# Altium PCB MB1364.PcbDoc (part 3 of 8)
Units mm, origin at the board's own origin, x right, y up, seen from the top; angles counter-clockwise.
Board outline 70 x 133.34 mm, 6 copper layers (Top Layer, Signal Layer 1, Signal Layer 2, Signal Layer 3, Signal Layer 4, Bottom Layer), stack 1.57 mm thick; 320 components, 286 nets, 1370 pads, 2009 vias.
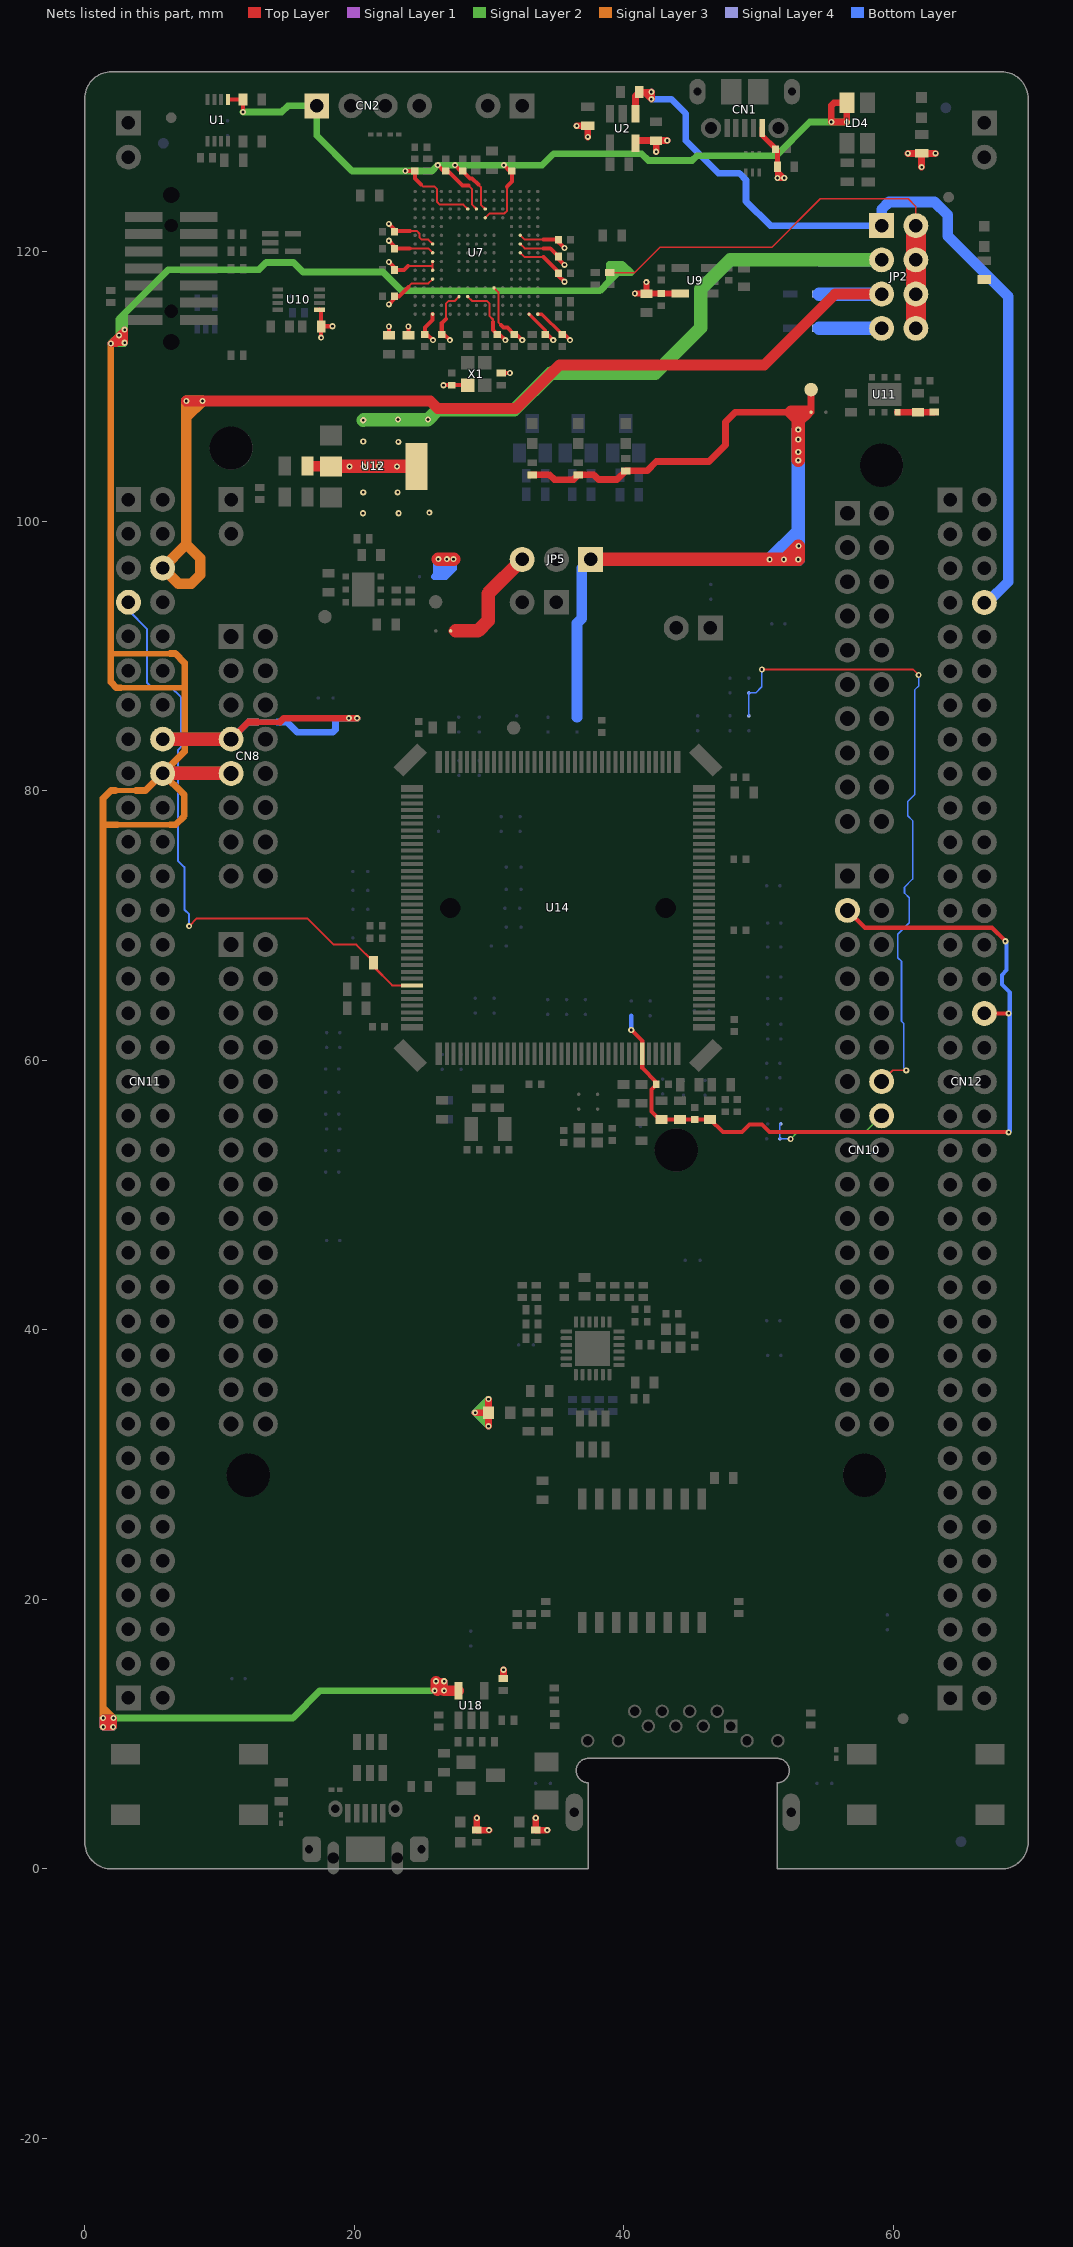
[diagram p6: the nets of this part, all layers, seen from the top]

## Part data (continued)
U18: library part MCD-00083, "Enhanced single channel power switches with active low enable pin", Alternate_Manufacturer="TEXAS INSTRUMENTS", Alternate_Manufacturer_Part_Number=TPS2041C, Manufacturer=STMICROELECTRONICS, BMS_Part_Number=9159003, ComponentLink1Description=Datasheet, ComponentLink1URL=http://tunmcdsvn.tun.st.com/Component_Datasheet_Library/Trunk/IC/STM_PWR-Switch_STMPS2141STR, ECCN_EU=NEC, ECCN_US=EAR99, Internal_Part_Number=MCD-00083, Manufacturer_Part_Number=STMPS2141STR, Part_Type=IC, Provided_By="SUBCO with ST control", Status=Released
U19: library part MCD-00163, "Very low capacitance ESD protection", Manufacturer=STMICROELECTRONICS, BMS_Part_Number=9151075, ComponentLink1Description=Datasheet, ComponentLink1URL=http://tunmcdsvn.tun.st.com/Component_Datasheet_Library/Trunk/Diodes/STM_ESD_USBLC6-2, ECCN_EU=NEC, ECCN_US=EAR99, Internal_Part_Number=MCD-00163, Manufacturer_Part_Number=USBLC6-2SC6, Part_Type=IC, Provided_By="SUBCO with ST control", Status=Released
X1: library part MCD-00597, "Oscillator 25Mhz, +-50ppm, Vcc:3.3V typ, square wave: [0.1Vcc;0.9Vcc], Enable pin, SMD", Alternate_Manufacturer=NDK, Alternate_Manufacturer_Part_Number="NZ2520SB 25MHz END4869B", Manufacturer_Part_Number="NZ2520SH 25MHz END4869C", BMS_Part_Number=9157050, ComponentLink1Description=Datasheet, ComponentLink1URL="http://tunmcdsvn.tun.st.com/Component_Datasheet_Library/Trunk/Crystal_Osc/NDK_NZ2520SH 25MHz END4869C", ECCN_EU=NEC, ECCN_US=EAR99, Internal_Part_Number=MCD-00597, Manufacturer=NDK, Part_Type=Crystal_Osc, Provided_By=SUBCO, Status=Released
X2: library part MCD-00091, "Crystal 32.768kHz, 6pF, +-20ppm, 50Kohms max, SMD", Manufacturer=NDK, Manufacturer_Part_Number="NX3215SA 32.768KHz EXS00A-MU00525", BMS_Part_Number=9157034, ComponentLink1Description=Datasheet, ComponentLink1URL="http://tunmcdsvn.tun.st.com/Component_Datasheet_Library/Trunk/Crystal_Osc/NDK_Crystal-For-ST_NX3215SA 32.768KHz EXS00A-MU00525 (EXS10B-21238)", ECCN_EU=NEC, ECCN_US=EAR99, Internal_Part_Number=MCD-00091, Order_Code_Digikey=644-1386, Part_Type=Crystal_Osc, Provided_By=SUBCO, Status=Released
X3 X4: library part MCD-01364, "Crystal 25MHz, 6pF, +-20ppm, 80ohms max, SMD", Manufacturer=NDK, Manufacturer_Part_Number="NX2016SA 25MHz EXS00A-CS11321", Package=NX2016SA, BMS_Part_Number=9157044, ComponentLink1Description=Datasheet, ComponentLink1URL="http://tunmcdsvn.tun.st.com/Component_Datasheet_Library/Trunk/Crystal_Osc/NDK_NX2016SA 25MHz EXS00A-CS11321 (EXS10B-28187)", ECCN_EU=NEC, ECCN_US=EAR99, Internal_Part_Number=MCD-01364, Order_Code_Digikey=644-1367, Part_Type=Crystal_Osc, Provided_By=SUBCO, Status=Released

## Free pads (board coordinates)
  round 3.2 hole 3.2 unplated: 0(10.866,105.409) 0(12.136,29.209) 0(43.886,53.339) 0(57.856,29.209) 0(59.126,104.139)

## Via types
v1: diameter 0.45, hole 0.2, Top Layer to Bottom Layer, tented both sides, 1933 vias
v2: diameter 0.45, hole 0.2, Top Layer to Bottom Layer, tented top, 67 vias
v3: diameter 0.6, hole 0.3, Top Layer to Bottom Layer, tented both sides, 9 vias

## Nets (pads, with @x,y where several pads share a name; then routed paths per layer and width w, separated by ;. In a path a pad name is that pad's centre, name@x,y a point inside that pad or via, vN(x,y) a via of type N, cw(c..) or ccw(c..) an arc to the next point about the centre after c; other vN are vias at no path point)
1V8: JP5.3 SB80.2 | length 8.5
  Top Layer w0.6: 27.3,91.85 27.525,91.85
  Top Layer w1: 27.525,91.85 29.175,91.85 29.925,92.6 29.925,94.623 JP5.3@32.456,97.154
3V3: CN8.7 CN11.16 JP5.1 L1.2 R26.2 R27.2 R28.2 R56.1 R65.2 R66.2 SB2.2 SB6.1 SB13.1 SB20.1 TP1.1 | length 155.2
  Top Layer w0.4: 12.845,85.089 14.501,85.089
  Top Layer w0.5: CN8.7@10.866,83.819 12.136,85.089 12.845,85.089 ; 14.501,85.089 14.791,85.379 19.166,85.379 v1@20.2,85.379 ; v1(28.966,33.854) L1.2@29.966,33.854 ; v1(29.091,3.779) R65.2@29.091,2.879 v1(29.991,2.879) ; v1(29.966,32.854) L1.2@29.966,33.854 ; v1(29.966,34.854) L1.2@29.966,33.854 ; R56.1@31.066,14.129 v1(31.066,14.779) ; R27.2@33.216,103.429 34.487,103.429 34.841,103.075 36.262,103.075 R28.2@36.616,103.429 37.771,103.429 38.121,103.079 39.491,103.079 R26.2@40.141,103.729 41.711,103.729 42.407,104.425 46.325,104.425 47.55,105.65 47.55,107.35 48.279,108.079 52.425,108.079 ; v1(33.466,3.779) R66.2@33.466,2.879 v1(34.316,2.879) ; 53.55,108.079 SB2.2@53.891,108.079 TP1.1@53.891,109.754
  Top Layer w1: CN11.16@5.786,83.819 CN8.7@10.866,83.819 ; v1(26.241,97.179) v1(26.866,97.179) v1(27.366,97.179) ; JP5.1@37.536,97.154 v1(50.816,97.154) v1(51.866,97.154) v1@51.966,97.154 ; v1(52.941,104.504) v1(52.941,105.129) v1(52.941,106.054) v1(52.941,106.779) 52.941,107.47 ; v1@51.966,97.154 52.941,98.129 v1(52.941,97.154) v1@51.966,97.154 ; 52.941,107.47 52.941,107.563 52.425,108.079 53.55,108.079 52.941,107.47
  Signal Layer 2 w0.5: v1(19.6,85.375) v1(20.2,85.375) ; v1(26.241,97.179) v1(26.866,97.179) v1(27.366,97.179) ; v1(28.966,33.854) 29.676,33.854 ; v1(28.966,33.854) 29.676,33.144 ; v1(28.966,33.854) 29.676,34.564 ; 29.676,33.144 29.676,33.854 ; 29.676,33.144 v1(29.966,32.854) v1(29.966,34.854) 29.676,34.564 ; 29.676,33.854 29.676,34.564
  Signal Layer 2 w0.6: v1(50.816,97.154) v1(51.866,97.154) v1@51.966,97.154 ; v1(52.941,104.504) v1(52.941,105.129) v1(52.941,106.054) v1(52.941,106.779) ; v1@51.966,97.154 v1(52.966,98.154) 52.966,97.179 v1(52.941,97.154) v1@51.966,97.154
  Signal Layer 2 w1: CN11.16@5.786,83.819 CN8.7@10.866,83.819
  Signal Layer 3 w0.5: v1(19.6,85.375) v1(20.2,85.375) ; v1(26.241,97.179) v1(26.866,97.179) v1(27.366,97.179)
  Signal Layer 3 w0.6: v1@50.941,97.154 v1(51.866,97.154) v1@51.966,97.154 ; v1(52.941,104.504) v1(52.941,105.129) v1(52.941,106.054) v1(52.941,106.779) ; v1@51.966,97.154 v1(52.966,98.154) 52.966,97.179 v1(52.941,97.154) v1@51.966,97.154
  Bottom Layer w0.4: 12.845,85.089 14.281,85.089
  Bottom Layer w0.5: CN8.7@10.866,83.819 12.136,85.089 12.845,85.089 ; 14.281,85.089 15.011,85.089 15.775,84.325 18.4,84.325 18.6,84.525 18.6,85.2 SB20.1@18.425,85.375 v1(19.6,85.375) v1(20.2,85.375) ; 26.1,96.379 26.866,97.145 v1(26.866,97.179) ; 26.1,96.379 26.1,97.038 v1(26.241,97.179) v1(26.866,97.179) ; 26.1,96.379 26.1,96.038 SB6.1@25.941,95.879 26.254,95.879 ; 26.254,95.879 26.779,95.879 27.366,96.466 v1@27.366,96.991 ; 26.254,95.879 v1@27.366,96.991 ; v1(26.866,97.179) v1(27.366,97.179) v1@27.366,96.991 ; v1(28.966,33.854) 29.62,33.199 ; v1(28.966,33.854) 29.62,33.854 ; v1(28.966,33.854) 29.62,34.508 ; 29.62,33.199 v1(29.966,32.854) 29.966,33.925 ; 29.62,33.199 29.62,33.854 ; 29.62,33.854 29.895,33.854 29.966,33.925 ; 29.62,33.854 29.62,34.508 ; 29.62,34.508 v1(29.966,34.854) 29.966,33.925
  Bottom Layer w0.8: SB13.1@36.525,85.45 36.525,92.425 36.875,92.775 36.875,96.493 JP5.1@37.536,97.154
  Bottom Layer w1: v1(50.816,97.154) v1@50.841,97.154 ; v1(52.941,106.779) v1(52.941,106.054) v1(52.941,105.129) v1(52.941,104.504) 52.941,99.254 ; v1@50.841,97.154 52.941,99.254 ; v1@50.841,97.154 v1(51.866,97.154) ; v1(51.866,97.154) v1@52.941,98.229 ; v1(51.866,97.154) v1(52.941,97.154) v1@52.941,98.229 ; v1@52.941,98.229 52.941,99.254
3V3_STLK: C2.2 C8.2 C9.2 C10.2 C11.2 C14.2 C15.2 C16.2 C17.2 C21.2 C22.2 C23.2 C24.2 C25.2 C27.2 C29.2 C30.2 C31.2 C32.2 C33.2 C34.2 C35.2 C36.2 C37.2 CN2.1 LD4.4 R24.1 U1.1 U7.C1 U7.C5 U7.C6 U7.C7 U7.C8 U7.C9 U7.F3 U7.G3 U7.G13 U7.H13 U7.J12 U7.J13 U7.K4 U7.N8 U7.N9 U7.N10 U7.P1 U7.R1 U9.5 U10.1 X1.4 | length 141.5
  Top Layer w0.15: 23.996,118.924 25.224,118.924 ; 24.016,117.379 24.271,117.634 25.496,117.634 U7.C5@25.816,117.954 ; 24.116,120.229 25.491,120.229 U7.C8@25.816,119.904 ; 24.141,121.529 24.644,121.529 24.836,121.336 24.836,121.059 25.016,120.879 25.491,120.879 U7.C9@25.816,120.554 ; 24.966,124.954 25.091,124.829 25.941,124.829 26.146,124.624 26.146,123.671 26.339,123.479 28.091,123.479 U7.G13@28.416,123.154 ; 25.225,118.925 25.224,118.924 ; 25.8,118.95 25.774,118.924 25.224,118.924 ; U7.C6@25.816,118.604 U7.C7@25.816,119.254 ; 26.791,114.979 26.791,116.131 26.984,116.324 27.436,116.324 U7.F3@27.766,116.654 ; U7.G3@28.416,116.654 28.736,116.334 29.839,116.334 30.036,116.136 30.036,115.209 30.291,114.954 30.291,114.779 ; 28.466,124.904 28.746,124.624 28.746,123.474 U7.H13@29.066,123.154 ; 29.216,124.954 29.396,124.774 29.396,123.474 U7.J13@29.716,123.154 ; U7.J12@29.716,122.504 30.041,122.829 31.144,122.829 31.336,123.021 31.336,124.799 31.341,124.804 ; U7.K4@30.366,117.304 30.686,116.984 30.686,114.759 30.891,114.554 ; U7.N8@32.316,119.904 32.641,119.579 34.041,119.579 ; U7.N9@32.316,120.554 32.641,120.229 34.041,120.229 ; U7.N10@32.316,121.204 32.641,120.879 34.041,120.879
  Top Layer w0.25: U7.P1@32.966,115.354 34.166,114.154 C33.2@34.166,113.854 ; U7.R1@33.616,115.354 33.916,115.354 C34.2@35.416,113.854
  Top Layer w0.3: U1.1@10.616,131.279 C2.2@11.741,131.279 v1(11.741,130.354) ; U10.1@17.416,115.679 17.541,115.554 C27.2@17.541,114.454 ; v1(17.541,113.604) C27.2@17.541,114.454 ; v1(18.391,114.454) C27.2@17.541,114.454 ; v1(22.562,116.083) 22.991,116.512 C25.2@22.991,116.679 23.316,116.679 24.016,117.379 ; v1(22.562,119.225) 22.991,118.796 C21.2@22.991,118.629 23.701,118.629 23.996,118.924 ; v1(22.562,120.8) 22.991,120.371 C16.2@22.991,120.204 23.016,120.229 24.116,120.229 ; v1(22.562,122.05) 22.991,121.621 C14.2@22.991,121.454 23.066,121.529 24.141,121.529 ; C35.2@22.566,113.779 v1(22.566,114.429) ; v1(23.791,125.979) C8.2@24.491,125.979 24.491,125.429 24.966,124.954 ; C36.2@24.016,113.779 v1(24.016,114.429) ; U7.C1@25.816,115.354 25.816,114.929 25.241,114.354 C29.2@25.241,113.854 25.408,113.854 v1(25.837,113.425) ; v1(26.195,126.408) 26.624,125.979 C9.2@26.791,125.979 26.966,125.979 28.041,124.904 28.466,124.904 ; v1(26.616,110.079) C37.2@27.241,110.079 X1.4@28.416,110.079 ; 26.791,114.979 26.491,114.679 C30.2@26.491,113.854 26.658,113.854 v1(27.087,113.425) ; v1(27.47,126.408) 27.899,125.979 C10.2@28.041,125.979 ; C10.2@28.066,125.979 C10.2@28.041,125.979 ; 29.216,124.954 28.741,125.429 28.579,125.429 28.041,125.967 C10.2@28.041,125.979 ; 30.291,114.779 30.291,114.179 C31.2@30.616,113.854 30.783,113.854 v1(31.212,113.425) ; 30.891,114.554 31.086,114.359 31.361,114.359 C32.2@31.866,113.854 32.033,113.854 v1(32.462,113.425) ; R24.1@30.916,110.979 v1(31.541,110.979) ; v1(31.095,126.408) 31.524,125.979 C11.2@31.691,125.979 31.716,125.954 31.716,125.179 31.341,124.804 ; 34.041,119.579 35.141,118.479 C22.2@35.141,118.379 C22.2@35.166,118.354 ; 34.041,120.229 34.541,120.229 C17.2@35.141,119.629 C17.2@35.166,119.604 ; 34.041,120.879 C15.2@35.141,120.879 C15.2@35.166,120.854 ; C33.2@34.166,113.854 34.333,113.854 v1(34.762,113.425) ; C22.2@35.141,118.354 C22.2@35.166,118.354 ; C17.2@35.141,119.604 C17.2@35.166,119.604 ; C15.2@35.141,120.854 C15.2@35.166,120.854 ; C34.2@35.416,113.854 35.583,113.854 v1(36.012,113.425) ; v1(35.595,117.758) 35.166,118.187 C22.2@35.166,118.354 ; v1(35.595,119.008) 35.166,119.437 C17.2@35.166,119.604 ; v1(35.595,120.258) 35.166,120.687 C15.2@35.166,120.854
  Top Layer w0.45: v1(40.816,116.879) C23.2@41.666,116.879 ; v1(41.666,117.729) C23.2@41.666,116.879 ; U9.5@44.191,116.879 C24.2@42.791,116.879 C23.2@41.666,116.879
  Top Layer w0.5: v1(55.391,129.604) v1(56.541,129.604) 56.541,131.004 LD4.4@56.566,131.029 55.591,131.029 55.391,130.829 v1(55.391,129.604)
  Signal Layer 2 w0.5: v1(11.741,130.354) 14.616,130.354 15.071,130.809 CN2.1@17.216,130.809 17.216,128.604 19.846,125.974 25.761,125.974 v1(26.195,126.408) v1(27.47,126.408) v1(31.095,126.408) 33.945,126.408 34.791,127.254 41.316,127.254 41.816,126.754 45.066,126.754 45.411,127.099 51.286,127.099 53.791,129.604 v1(55.391,129.604) v1(56.541,129.604)
5V: C40.2 CN8.9 CN11.18 JP2.2 JP2.4 JP2.6 JP2.8 R12.2 R15.1 R25.2 U11.6 U18.5 | length 322
  Top Layer w0.12: R15.1@38.941,118.429 40.791,118.429 42.666,120.304 50.966,120.304 54.566,123.904 61.096,123.904 61.666,123.334 JP2.2@61.666,121.919
  Top Layer w0.45: v1(2.541,113.779) 2.956,114.194 v1(2.966,114.204)
  Top Layer w0.5: v1(1.941,113.179) v1(2.541,113.779) ; v1(2.141,11.204) 2.141,10.554 v1(2.116,10.529) v1(1.366,10.529) ; v1@2.956,114.194 2.966,114.194 2.966,113.804 ; U18.5@27.736,13.229 U18.5@27.741,13.224 ; U11.6@60.298,108.076 61.813,108.076 C40.2@61.816,108.079 R25.2@63.016,108.079 ; v1(1.366,10.529) v1(1.366,11.204) 2.041,11.204 v1(1.366,10.529) ; 2.391,113.229 2.966,113.804 ; 2.391,113.229 2.004,113.229 1.954,113.179 2.341,113.179 2.391,113.229 ; 2.391,113.229 v1(2.966,113.229) 2.966,113.804 ; v1(25.966,13.229) 25.966,13.829 v1(26.066,13.929) v1(26.666,13.929) ; v1(25.966,13.229) 26.166,13.229 v1(26.666,13.229) v1(26.666,13.929) ; v1(25.966,13.229) 26.066,13.329 v1(26.666,13.929)
  Top Layer w0.8: v1(26.066,13.929) 26.066,13.329 v1@26.166,13.229 ; v1(26.666,13.229) U18.5@27.736,13.229
  Top Layer w1: CN11.18@5.786,81.279 5.802,81.295 10.85,81.295 CN8.9@10.866,81.279
  Top Layer w1.5: JP2.8@61.666,114.299 JP2.6@61.666,116.839 JP2.4@61.666,119.379 JP2.2@61.666,121.919
  Signal Layer 2 w0.5: v1(1.941,113.179) v1@1.966,113.179 ; v1(26.666,13.229) v1(25.966,13.229) ; 40.541,118.429 40.516,118.429 ; v1@1.466,10.529 2.116,11.179 v1(2.116,10.529) v1@1.466,10.529 ; v1@1.466,10.529 v1(1.366,10.529) v1(1.366,11.204) v1(2.141,11.204) 15.441,11.204 17.466,13.229 v1(25.966,13.229) ; v1@1.966,113.179 1.966,113.204 v1(2.541,113.779) ; v1@1.966,113.179 2.916,113.179 v1(2.966,113.229) v1@2.966,113.354 ; v1(2.541,113.779) 2.541,114.979 2.966,115.404 ; v1(2.541,113.779) v1(2.966,114.204) ; v1(2.541,113.779) v1@2.966,113.354 ; v1@2.966,113.354 v1(2.966,114.204) ; v1(2.966,114.204) 2.966,115.404 ; 2.966,115.404 6.216,118.654 12.941,118.654 13.466,119.179 15.491,119.179 16.191,118.479 22.141,118.479 23.541,117.079 38.216,117.079 38.941,117.804 ; v1(25.966,13.229) 25.966,13.829 v1(26.066,13.929) ; v1(26.066,13.929) 26.666,13.329 v1(26.666,13.929) v1(26.066,13.929) ; 38.941,117.804 39.566,118.429 ; 38.941,117.804 38.941,118.429 ; 38.941,118.429 39.566,118.429 ; 38.941,118.429 38.941,119.054 ; 38.941,119.054 39.566,118.429 ; 38.941,119.054 39.466,119.054 ; 39.466,119.054 39.891,119.054 40.516,118.429 ; 39.466,119.054 40.091,118.429 ; 39.566,118.429 40.091,118.429 ; 40.091,118.429 40.516,118.429
  Signal Layer 2 w1: CN11.18@5.786,81.279 5.802,81.295 10.85,81.295 CN8.9@10.866,81.279
  Signal Layer 2 w1.5: JP2.8@61.666,114.299 JP2.6@61.666,116.839 JP2.4@61.666,119.379 JP2.2@61.666,121.919
  Signal Layer 3 w0.4: 1.941,90.179 1.951,90.169 6.347,90.169 ; 2.286,80.009 3.807,80.009 ; 2.401,77.469 6.347,77.469 ; 2.685,87.629 7.416,87.629 7.441,87.654
  Signal Layer 3 w0.5: 2.286,80.009 1.946,80.009 1.366,79.429 1.366,77.454 ; 2.401,77.469 1.381,77.469 1.366,77.454 ; 2.685,87.629 2.366,87.629 1.941,88.054 1.941,90.179 v1(1.941,113.179) v1@1.991,113.229 ; v1@2.941,113.254 2.541,113.654 v1(2.541,113.779) ; 3.807,80.009 4.516,80.009 CN11.18@5.786,81.279 ; 6.347,77.469 6.731,77.469 7.391,78.129 7.391,79.674 CN11.18@5.786,81.279 ; 6.347,90.169 6.726,90.169 7.416,89.479 7.416,87.629 7.416,82.909 CN11.18@5.786,81.279 ; v1(1.366,11.204) 1.366,11.979 ; v1(1.366,11.204) v1(2.141,11.204) 1.366,11.979 ; v1(1.366,11.204) v1(1.366,10.529) v1@1.466,10.529 ; 1.366,11.979 1.366,77.454 ; v1@1.466,10.529 2.116,11.179 v1(2.116,10.529) v1@1.466,10.529 ; v1@1.991,113.229 v1(2.966,113.229) v1(2.966,114.204) v1(2.541,113.779) ; v1@1.991,113.229 v1(2.541,113.779) ; v1(26.066,13.929) v1@26.666,13.329 ; v1(26.066,13.929) 25.966,13.829 v1(25.966,13.229) v1(26.666,13.229) v1@26.666,13.329 ; v1(26.066,13.929) v1(26.666,13.929) v1@26.666,13.329
  Signal Layer 3 w1.5: JP2.8@61.666,114.299 JP2.2@61.666,121.919
  Bottom Layer w0.5: v1(2.141,11.204) v1(1.366,11.204) v1(1.366,10.529) v1@1.491,10.529 ; v1(26.066,13.929) 25.966,13.829 v1(25.966,13.229) v1(26.666,13.229) v1@26.666,13.354 ; v1@1.491,10.529 2.116,11.154 v1(2.116,10.529) v1@1.491,10.529 ; v1(2.541,113.779) v1(2.966,114.204) v1(2.966,113.229) ; v1(2.541,113.779) v1(1.941,113.179) 2.916,113.179 v1(2.966,113.229) ; v1(2.541,113.779) 2.541,113.654 v1(2.966,113.229) ; v1@26.666,13.354 26.091,13.929 v1(26.666,13.929) v1@26.666,13.354
  Bottom Layer w1.5: JP2.8@61.666,114.299 JP2.2@61.666,121.919
5V_EXT: CN11.6 D2.1 JP2.5 | length 82.2
  Top Layer w0.8: v1(7.541,108.904) v1(8.741,108.904) 25.641,108.904 26.191,108.354 31.991,108.354 35.221,111.584 50.421,111.584 55.676,116.839 JP2.5@59.126,116.839
  Signal Layer 3 w0.8: 7.541,98.274 8.575,97.24 8.575,96.025 7.905,95.355 6.95,95.355 CN11.6@5.786,96.519 7.541,98.274 ; 7.541,98.274 7.541,107.704 ; 7.541,107.704 v1(8.741,108.904) v1(7.541,108.904) 7.541,107.704
  Bottom Layer w1: D2.1@54.481,116.839 JP2.5@59.126,116.839
5V_USB_CHGR: C3.2 C6.2 CN1.1 D3.1 JP2.7 R1.2 R2.2 U2.5 U6.1 | length 20.7
  Top Layer w0.4: U2.5@40.866,128.014 U2.5@40.866,128.229 ; C3.2@42.394,128.229 C3.2@42.396,128.227 ; CN1.1@50.266,129.158 50.266,128.626 51.249,127.643 C6.2@51.249,127.593 51.399,127.443 U6.1@51.399,126.293 U6.1@51.399,125.946 ; U6.1@51.399,125.946 v1(51.899,125.446) v1(51.399,125.446) U6.1@51.399,125.946
  Top Layer w0.5: v1(36.498,129.324) 36.503,129.329 R1.2@37.325,129.329 37.325,128.507 v1(37.33,128.502) ; U2.5@40.866,128.229 C3.2@42.394,128.229 ; v1(42.401,127.401) 42.396,127.406 C3.2@42.396,128.227 43.218,128.227 v1(43.223,128.232) ; v1(61.066,127.279) R2.2@62.091,127.279 ; v1(62.091,126.254) R2.2@62.091,127.279 ; v1(63.116,127.279) R2.2@62.091,127.279
  Signal Layer 1 w0.4: v1@51.416,125.429 51.433,125.446 v1(51.899,125.446)
  Signal Layer 2 w0.4: v1(51.399,125.446) v1(51.899,125.446)
  Signal Layer 3 w0.4: v1(51.399,125.446) v1(51.899,125.446)
  Signal Layer 4 w0.4: v1(51.399,125.446) v1(51.899,125.446)
  Bottom Layer w0.4: v1(51.399,125.446) v1(51.899,125.446)
  Bottom Layer w1: D3.1@54.481,114.299 JP2.7@59.126,114.299
5V_USB_STLK: C1.2 CN12.8 JP2.1 U2.1 | length 65.7
  Top Layer w0.508: U2.1@40.866,130.214 40.866,131.537 C1.2@41.148,131.82 41.525,131.82 ; 41.525,131.82 v1@42.041,131.82 ; 41.525,131.82 v1(42.041,131.304) v1@42.041,131.82 ; v1@42.041,131.82 42.05,131.82 v1(42.041,131.829) v1@42.041,131.82
  Bottom Layer w0.5: v1(42.041,131.304) 43.516,131.304 44.591,130.229 44.591,128.229 47.016,125.804 48.566,125.804 49.071,125.299 49.071,123.724 50.876,121.919 JP2.1@59.126,121.919
  Bottom Layer w0.508: v1(42.041,131.304) v1(42.041,131.829)
  Bottom Layer w0.8: JP2.1@59.126,121.919 59.126,123.126 59.679,123.679 63.046,123.679 64.025,122.7 64.025,121.145 68.516,116.654 68.516,95.504 66.966,93.954 CN12.8@66.746,93.954
5V_VIN: C41.2 D1.1 JP2.3 U12.2 U12.4 | length 57.8
  Top Layer w0.8: C41.2@16.541,104.074 U12.2@18.246,104.074
  Top Layer w1: U12.2@18.246,104.074 U12.2@18.266,104.054 v1(19.641,104.054) v1(20.691,104.054) v1(23.166,104.054) U12.4@24.616,104.054
  Signal Layer 2 w1: v1(20.666,107.479) 20.716,107.529 v1(23.241,107.529) v1(25.466,107.529) 26.191,108.254 31.866,108.254 34.591,110.979 42.341,110.979 45.716,114.354 45.716,117.204 47.891,119.379 JP2.3@59.126,119.379
  Bottom Layer w1: D1.1@54.481,119.379 JP2.3@59.126,119.379
  other v1: 20.641,100.579 23.291,100.579 25.566,100.629 20.666,102.129 23.216,102.129 21.841,104.079 23.266,105.879 20.666,105.904
AGND: C58.1 C64.2 C65.1 C66.2 C67.1 CN10.3 CN12.32 SB43.2 U14.31 | length 64.9
  Top Layer w0.3: v1(40.55,62.25) 41.366,61.434 U14.31@41.366,60.479 41.366,59.409 42.4,58.375 C58.1@42.4,58.225 42.4,58.175 42.05,57.825 42.05,56.2 42.65,55.6 C64.2@42.8,55.6 C65.1@44.15,55.6 C67.1@45.275,55.6 C66.2@46.4,55.6 47.341,54.659 48.421,54.659 48.76,54.659 49.327,55.225 50.25,55.225 50.816,54.659 55.716,54.659 68.541,54.659 v1(68.55,54.65) ; CN10.3@56.586,71.119 57.876,69.829 67.321,69.829 68.322,68.828 v1(68.303,68.828) ; CN12.32@66.746,63.474 68.555,63.474 68.556,63.475 v1(68.553,63.478)
  Bottom Layer w0.3: v1(40.55,62.25) SB43.2@40.55,63.3 ; v1(68.303,68.828) 68.391,68.741 68.391,66.68 68.04,66.329 68.04,65.616 68.631,65.025 68.631,63.556 v1(68.553,63.478) ; v1@68.549,63.474 v1(68.553,63.478) ; v1(68.55,54.65) 68.525,54.65 68.631,54.756 68.631,63.4 v1(68.553,63.478)
ARD_D0_RX: CN10.16 SB66.1 SB68.2 | length 9.4
  Signal Layer 2 w0.12: v1(52.375,54.15) 52.875,54.65 57.897,54.65 CN10.16@59.126,55.879
  Bottom Layer w0.12: SB68.2@51.65,55.275 51.575,55.2 SB66.1@51.575,54.175 52.35,54.175 v1(52.375,54.15)
ARD_D1_TX: CN10.14 SB8.1 SB18.2 | length 48.9
  Top Layer w0.12: v1(50.238,88.988) 61.462,88.988 v1(61.875,88.575) ; CN10.14@59.126,58.419 59.957,59.25 v1(60.95,59.25)
  Bottom Layer w0.12: SB18.2@49.275,85.55 SB8.1@49.275,87.25 49.776,87.25 50.238,87.712 v1(50.238,88.988) ; v1(60.95,59.25) 60.755,59.445 60.755,62.739 60.6,62.894 60.6,67.338 60.325,67.613 60.325,69.352 61.181,70.208 61.181,72.05 60.82,72.411 60.82,72.843 61.421,73.444 61.421,77.781 61.07,78.132 61.07,79.194 61.571,79.695 61.571,87.466 61.875,87.77 v1(61.875,88.575)
BOOT0: CN11.7 R33.1 U14.138 | length 46
  Top Layer w0.155: v1(7.75,69.95) 8.325,70.525 16.525,70.525 18.475,68.575 20.161,68.575 21.425,67.311 R33.1@21.425,67.225 21.425,66.95 22.821,65.554 U14.138@24.291,65.554
  Bottom Layer w0.155: CN11.7@3.246,93.979 3.246,93.376 4.616,92.006 4.616,88.023 4.911,87.728 6.353,87.728 7.156,86.926 7.156,83.252 6.909,83.005 6.909,74.813 7.395,74.326 7.395,71.179 7.75,70.825 v1(7.75,69.95)